# EAGLE board Driver Channel (EAGLE 9.7.0)
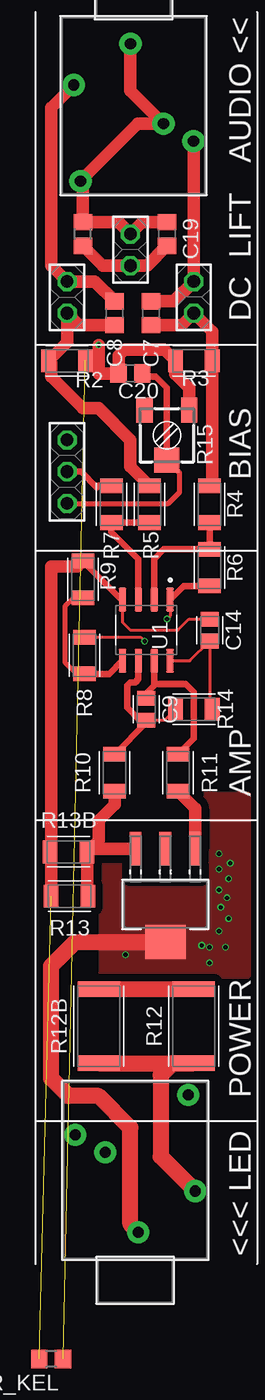
[diagram p0: board, top side]
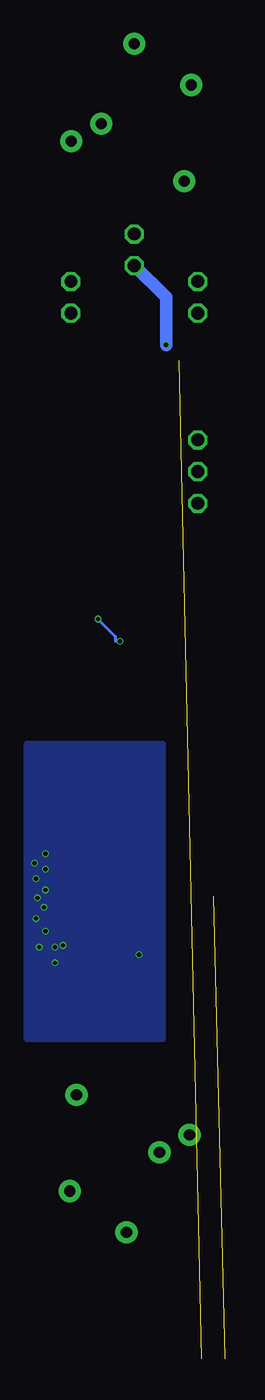
[diagram p1: board, bottom side, seen from below]

No outline drawn. Coordinates in mm, seen from the top.
Copper layers (1*16): Top 0.035mm / dielectric 1.53mm / Bottom 0.035mm
Design rules "dmxON_JLCPCB_2L_Standard.dru": minimum track width 5mil, minimum drill 0.3mm, track to track 5mil, track to pad 5mil, pad to pad 0.15mm, via to via 5mil, smd to smd 5mil, copper to edge 0.3mm, drill to drill 0.25mm, minimum pad ring 0.25mm, minimum via ring 0.075mm, stop-mask expansion 0.05mm, vias tented up to drill 0.5mm, thermal gap 10mil

## Footprints (pad centres in the part's own frame; a part is rotated, then mirrored left to right if it is on the bottom)
1503_09_LMB = drill 0.9 pad 1.778 slot 1.7: 1 0,0; 4 -4,-11 | drill 0.9 pad 1.778 slot 1.7 rotated 90: 2 -4.55,-3.3; 3 5.05,-7.8; 5 2.65,-6.4
1X03 = drill 1.016 octagon: 1 -2.54,0; 2 0,0; 3 2.54,0
C0805 = smd 1.3 x 1.5: 1 -0.95,0; 2 0.95,0
CAPC2012X110 = smd 1.165 x 1.465: 1 -0.875,0; 2 0.875,0
1X02 = drill 1.016 octagon: 1 -1.27,0; 2 1.27,0
RESC3216X70 = smd 1.165 x 1.815: 1 -1.475,0; 2 1.475,0
RESC6332X71 = smd 1.231 x 3.37: 1 -2.97,0; 2 2.97,0
RTRIM3314J = smd 1.3 x 2: 1 1.8,-2; 3 -1.8,-2 | smd 2 x 2: 2 0,2
R0805 = smd 1.3 x 1.5: 1 -0.95,0; 2 0.95,0
SOIC127P600X175-8N = smd 1.9 x 0.6: 1 -2.455,1.905; 2 -2.455,0.635; 3 -2.455,-0.635; 4 -2.455,-1.905; 5 2.455,-1.905; 6 2.455,-0.635; 7 2.455,0.635; 8 2.455,1.905
SOT-223_3P7X6P7_ONS = smd 0.94 x 2.692: 1 -2.388,-4.458; 2 0,-4.458; 3 2.388,-4.458 | smd 3.251 x 2.692: 4 0,3.01

## Placement (x,y rotation side)
AUDIO_IN  1503_091503_09_LMB  [1503_09_LMB]  7.62,97.79 0 top
BIAS_SEL  PINHD-1X3  [1X03]  2.54,63.5 270 top
C7  1uF  [C0805]  9.27,76.2 90 top
C8  1uF  [C0805]  6.35,76.2 90 top
C9  1nF  [CAPC2012X110]  8.89,44.45 270 top
C14  100nF  [CAPC2012X110]  13.97,50.8 270 top
C19  10nF DNF  [C0805]  10.54,82.55 270 top
C20  10uF  [C0805]  7.62,71.37 180 top
J_DC_COLD  PINHD-1X2  [1X02]  2.54,77.47 90 top
J_DC_HOT  PINHD-1X2  [1X02]  12.7,77.47 270 top
J_LED  1503_091503_09_LMB  [1503_09_LMB]  8.26,2.54 180 top
J_LIFT  PINHD-1X2  [1X02]  7.62,81.28 270 top
R2  1M  [RESC3216X70]  2.54,72.39 180 top
R3  1M  [RESC3216X70]  12.7,72.39 180 top
R4  100k  [RESC3216X70]  13.97,60.89 270 top
R5  100k  [RESC3216X70]  9.14,60.89 270 top
R6  100k  [RESC3216X70]  13.97,55.81 270 top
R7  100k  [RESC3216X70]  6.1,60.89 90 top
R8  10k  [RESC3216X70]  3.94,48.77 270 top
R9  1.6k  [RESC3216X70]  3.81,54.86 270 top
R10  1k  [RESC3216X70]  6.35,39.37 270 top
R11  220R  [RESC3216X70]  11.43,39.37 270 top
R12  47R  [RESC6332X71]  12.7,19.05 90 top
R12B  47R HPO  [RESC6332X71]  5.08,19.05 90 top
R13  4.7R  [RESC3216X70]  2.74,29.46 0 top
R13B  4.7R HPO  [RESC3216X70]  2.67,33.02 0 top
R14  470k  [RESC3216X70]  12.7,44.45 0 top
R15  10k  [RTRIM3314J]  10.54,66.42 180 top
R_KEL  0  [R0805]  1.27,-7.62 180 top
R_LIFT  0  [R0805]  3.81,82.55 90 top
U1  MCP6002-I/SN  [SOIC127P600X175-8N]  8.89,50.8 270 top
U3  BCP56-16  [SOT-223_3P7X6P7_ONS]  10.42,28.82 180 top

## Library data of the parts
AUDIO_IN J_LED = 3.5mm Jack; COPYRIGHT: Copyright (C) 2026 Ultra Librarian. All rights reserved.; MANUFACTURER_NAME: Lumberg; MANUFACTURER_PART_NUMBER: 1503 09
BIAS_SEL = Connector; CATEGORY_L1: Connectors; CATEGORY_L2: Headers; CATEGORY_L3: Male Pins; DESCRIPTION: Header-Straight-3 Position; PACKAGE: Through Hole; PITCH: 0.100" (2.54mm)
C7 C8 C19 C20 = rcl; SPICEPREFIX: C
C9 C14 = Capacitor; CATEGORY_L1: Capacitor; CATEGORY_L2: Ceramic Capacitors; CATEGORY_L3: MLCC; PACKAGE: Surface Mount; PACKAGE_SIZE: 0805
J_DC_COLD J_DC_HOT J_LIFT = Connector; CATEGORY_L1: Connectors; CATEGORY_L2: Headers; CATEGORY_L3: Male Pins; DESCRIPTION: Header-Straight-2 Position; PACKAGE: Through Hole; PITCH: 0.100" (2.54mm)
R2-R11 R13 R13B R14 = Resistor; CATEGORY_L1: Resistors; DESCRIPTION: Chip Resistor 3.20 X 1.60 X 0.70 mm body 1206(3216-METRIC) Package; PACKAGE: Surface Mount; PACKAGE_SIZE: 1206
R12 R12B = Resistor; CATEGORY_L1: Resistors; DESCRIPTION: Chip Resistor 6.30 X 3.20 X 0.71 mm body 2512(6332-METRIC) Package; PACKAGE: Surface Mount; PACKAGE_SIZE: 2512
R15 = rcl; SPICEMODEL: X; SPICEPREFIXL: POT
R_KEL R_LIFT = rcl; SPICEPREFIX: R
U1 = MCP6002-I_SN; AVAILABILITY: In Stock; CHECK_PRICES: https://www.snapeda.com/parts/MCP6002-I/SN/Microchip+Technology/view-part/?ref=eda; DESCRIPTION: Microchip , Dual Op Amp, 1MHzCMOS, Rail to Rail, 3V, 5V, 8-Pin SOIC | Microchip Technology Inc. MCP6002-I/SN; MF: Microchip Technology; MP: MCP6002-I/SN; PACKAGE: SO-8 Microchip; PRICE: None; PURCHASE-URL: https://www.snapeda.com/api/url_track_click_mouser/?unipart_id=6177737&manufacturer=Microchip Technology&part_name=MCP6002-I/SN&search_term=mcp6002-i/sn; SNAPEDA_LINK: https://www.snapeda.com/parts/MCP6002-I/SN/Microchip+Technology/view-part/?ref=snap
U3 = BCP56; COPYRIGHT: Copyright (C) 2026 Ultra Librarian. All rights reserved.; MANUFACTURER_NAME: onsemi; MANUFACTURER_PART_NUMBER: BCP56-16T1G

## Nets
3V3_A: C14.2 R14.2 U1.8
3V3_BIAS: R15.1
DAC_IN: BIAS_SEL.1
GND: C19.2 C20.2 J_LIFT.2 R2.1 R3.2 R15.3 R_KEL.1 R_LIFT.1
K_GND: C14.1 R9.1 R13.1 R13B.1 R_KEL.2 U1.4
LED_SUPPLY: R12.2 R12B.2
N$1: C8.1 J_DC_COLD.1 R2.2 R5.1
N$2: C7.1 J_DC_HOT.2 R3.1 R4.1
N$3: R4.2 R6.1 U1.2
N$4: R5.2 R7.1 U1.3
N$5: R6.2 R8.1 U1.1
N$6: R8.2 R9.2 U1.5
N$7: R11.2 U3.1
N$8: J_LED.1 U3.4
N$9: J_LED.2 R12.1 R12B.1
N$10: R10.2 R13.2 R13B.2 U3.3
N$11: C9.1 R11.1 U1.7
N$12: C9.2 R10.1 R14.1 U1.6
N$13: BIAS_SEL.3 C20.1 R15.2
N$14: AUDIO_IN.2 C8.2 J_DC_COLD.2
N$15: AUDIO_IN.3 C7.2 J_DC_HOT.1
N$16: BIAS_SEL.2 R7.2
SLEEVE: AUDIO_IN.1 AUDIO_IN.4 AUDIO_IN.5 C19.1 J_LIFT.1 R_LIFT.2

## Tracks (layer width: path | path; a pad name or v marks a point on that pad's centre or on a via)
3V3_A
  Top 0.254: U1.8 12.39,48.34 C14.2 13.97,44.66 R14.2
GND  (via drill 0.35)  (1 unrouted)
  Top 1.016: R2.1 5.08,72.39 | R_LIFT.1 5.4,80.01 J_LIFT.2 8.95,80.01 C19.2 | 5.08,72.39 5.08,71.37 C20.2 6.67,72.79 7.16,73.28 10.34,73.28 R3.2 11.22,71.33 12.34,70.21 R15.3 | 5.08,72.39 v5.08,73.66
  Bottom 1.016: v5.08,73.66 5.08,77.47 J_LIFT.2
K_GND  (1 unrouted)
  Top 0.254: C14.1 12.3,51.67 11.43,50.8 7.62,50.8 6.99,51.44 U1.4
  Top 0.508: R9.1 6.89,53.26 U1.4
  Top 1.016: R13.1 1.27,32.94 R13B.1 1.27,33.1 1.27,55.88 3.35,55.88 R9.1
LED_SUPPLY
  Top 1.27: R12.2 R12B.2
N$1
  Top 1.016: C8.1 3.49,75.25 J_DC_COLD.1 2.54,73.86 R2.2 1.27,72.19 1.27,71.12 3.81,68.58 5.08,68.58 7.62,66.04 7.62,63.89 R5.1
N$2
  Top 0.508: 14.1,62.5 R4.1
  Top 1.016: C7.1 11.75,75.25 J_DC_HOT.2 14.18,74.72 R3.1 14.18,62.58 14.1,62.5
N$3
  Top 0.508: U1.2 9.53,56.52 10.3,57.29 R6.1 R4.2
N$4
  Top 0.508: U1.3 8.26,56.52 6.1,58.67 R7.1 R5.2
N$5  (via drill 0.35)
  Top 0.254: U1.1 10.79,51.94 v10.54,51.69 | R8.1 8.43,50.24 v8.76,49.91
  Top 0.508: U1.1 11.88,54.34 R6.2
  Bottom 0.254: v10.54,51.69 9.14,50.29 9.14,49.91 v8.76,49.91
N$6
  Top 0.406: R8.2 3.3,47.29 2.41,48.18 2.41,52.75 3.05,53.39 R9.2
  Top 0.508: U1.5 5.93,47.29 R8.2
N$7
  Top 1.016: R11.2 12.81,36.52 U3.1
N$8  (via drill 0.35)
  Top 1.27: J_LED.1 7.62,3.17 7.62,10.92 5.08,13.46 2.67,13.46 1.27,14.86 1.27,23.88 3.2,25.81 U3.4
  other vias: 7.24,24.78 13.34,25.53 14.73,31.62 13.97,24.13 13.97,25.4 15.24,25.4 14.73,26.67 15.49,27.69 14.86,28.57 15.37,29.34 14.73,29.97 15.49,30.86 15.62,32.13 14.73,32.89
  pour Top (isolate 0.61, no thermals): 5.33,23.11 17.02,23.11 17.02,37.59 6.2,37.59 5.33,36.72
  pour Bottom (isolate 0.406, no thermals): 5.33,18.03 16.26,18.03 16.26,41.66 5.33,41.66
N$9
  Top 1.27: R12B.1 R12.1 11,16.08 10.03,15.11 10.03,8.61 J_LED.2
N$10
  Top 1.016: R10.2 6.35,36.83 5.08,35.56 5.08,33.96 R13B.2 | R13B.2 4.4,33.27 U3.3 | R13.2 4.14,29.54 R13B.2
N$11
  Top 0.508: U1.7 9.53,46.35 | 9.53,46.35 8.89,45.72 C9.1 | R11.1 12.7,42.12 12.7,45.85 12.06,46.48 9.65,46.48 9.53,46.35
N$12
  Top 0.254: R14.1 10.35,43.58 C9.2
  Top 0.508: 8.49,43.58 C9.2 | C9.2 8.89,43.38 R10.1 | 8.26,47.87 U1.6 8.26,46.86 8,46.61 7.62,46.61 7.37,46.35 7.37,44.58 8.37,43.58 C9.2
N$13
  Top 0.406: BIAS_SEL.3 10.67,60.96 11.56,61.85 11.56,63.41 R15.2
  Top 0.508: C20.1 8.82,71.12 9.65,71.12 10.54,70.23 R15.2
N$14
  Top 1.016: C8.2 4.76,78.74 J_DC_COLD.2 1.27,80.01 1.27,92.69 AUDIO_IN.2
N$15
  Top 1.016: AUDIO_IN.3 12.7,89.96 J_DC_HOT.1 11.11,77.15 C7.2
N$16
  Top 0.508: BIAS_SEL.2 3.67,63.5 4.94,62.23 5.08,62.37 R7.2
SLEEVE
  Top 1.016: AUDIO_IN.1 7.62,94.04 AUDIO_IN.5 8.22,91.39 AUDIO_IN.4 3.81,86.6 R_LIFT.2 6.67,83.5 J_LIFT.1 8.57,83.5 C19.1

## Text on the board
tPlace: AUDIO << | LIFT | DC | BIAS | AMP | POWER | <<< LED
tDocu: DAC | POT